# Altium PCB 汽车空调控制器-540V-ADP32F036QP48Q.pcbdoc (part 2 of 2)
Units mm, origin at the board's own origin, x right, y up, seen from the top; angles counter-clockwise.
Board outline 106.25 x 93.7 mm, 2 copper layers (Top Layer, Bottom Layer); 167 components, 106 nets, 476 pads, 259 vias.
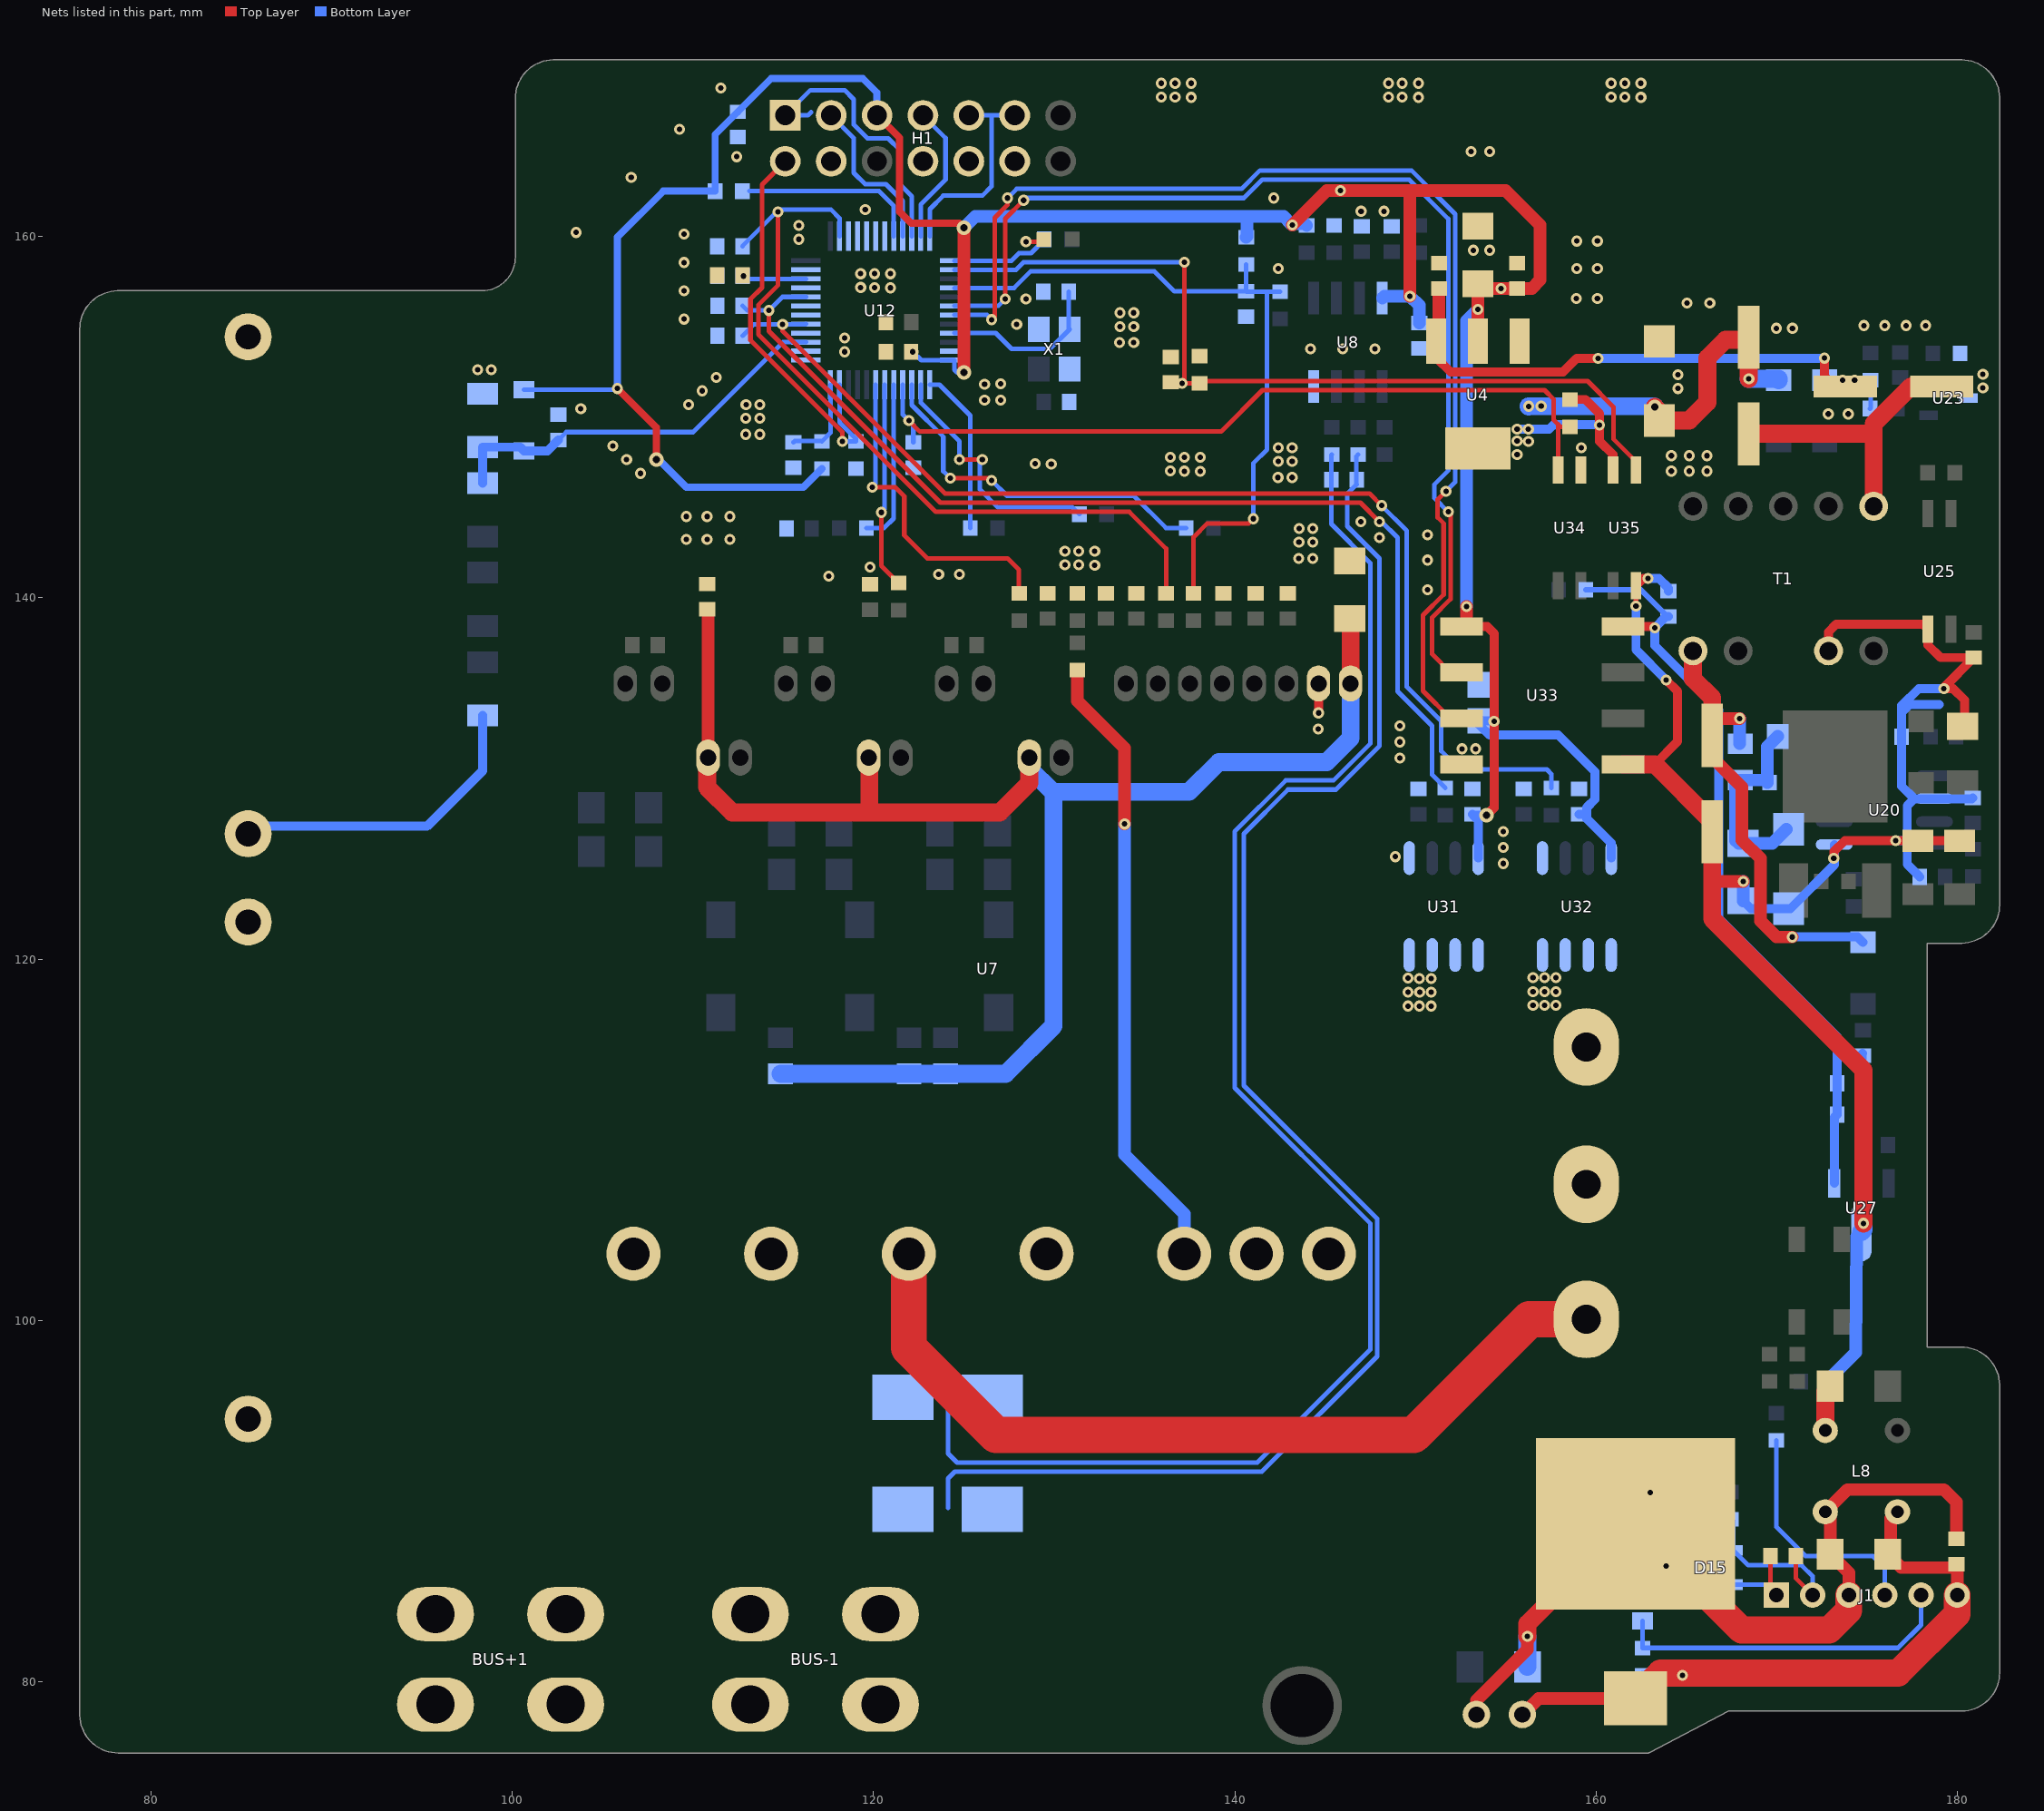
[diagram p2: the nets of this part, all layers, seen from the top]

## Via types
v1: diameter 0.61, hole 0.305, Top Layer to Bottom Layer, 254 vias
v2: diameter 0.8, hole 0.4, Top Layer to Bottom Layer, 5 vias

## Nets (pads, with @x,y where several pads share a name; then routed paths per layer and width w, separated by ;. In a path a pad name is that pad's centre, name@x,y a point inside that pad or via, vN(x,y) a via of type N, cw(c..) or ccw(c..) an arc to the next point about the centre after c; other vN are vias at no path point) (continued)
$4N1962: C71.1 U12.21 X1.1 | length 9.3
  Bottom Layer w0.254: U12.21@124.479,154.647 126.766,154.647 127.645,153.768 129.768,153.768 X1.1@130.853,154.853 130.809,154.896 C71.1@130.809,156.928
$4N10163: C65.2 C75.2 U12.46 | length 3.6
  Bottom Layer w0.254: C75.2@112.763,157.802 112.918,157.647 U12.46@116.259,157.647
  other v1: 112.816,157.802
$4N10279: R52.1 U12.13 | length 5.5
  Bottom Layer w0.254: U12.13@124.479,158.647 127.631,158.647 128.056,159.072 128.728,159.072 129.462,159.805 R52.1@129.462,159.834
$4N10403: R54.1 U12.8 | length 10
  Bottom Layer w0.254: R54.1@113.126,162.501 120.309,162.501 121.119,161.69 U12.8@121.119,160.007
+3.3V: C14.1 C48.1 C69.1 C73.1 C92.2 C111.1 C113.1 C140.2 D16.1 H1.5 R47.2 R54.2 R109.2 R115.2 R133.2 U4.2 U4.4 U8.8 U12.24 U31.8 U32.8 U33.1 U35.4 | length 184.4
  Top Layer w0.4: v1(105.831,151.579) 107.99,149.42 v2(107.99,147.642) ; H1.5@120.199,166.692 121.452,165.439 121.452,161.358 122.087,160.723 124.754,160.723 v2(125.008,160.469)
  Top Layer w0.5: U33.1@152.55,138.404 153.967,138.404 154.351,138.02 ; v2(153.926,127.957) 154.345,128.375 v1(154.345,133.164) 154.345,138.02 ; R115.2@158.545,150.965 158.554,150.974 159.395,150.974 160.187,150.182 v1(160.187,149.547) 160.187,148.658 160.929,147.916 U35.4@160.929,147.065
  Top Layer w0.7: v2(125.008,152.468) v2(125.008,160.469) ; v1(143.175,160.626) 145.08,162.531 v1(145.842,162.531) 149.696,162.531 ; v1(149.696,156.689) 149.696,162.531 ; U33.1@152.55,138.404 152.821,138.675 v1(152.821,139.514) ; U4.2@153.45,154.201 v1(153.45,155.955) C92.2@153.45,157.382 153.717,157.115 v1(154.74,157.115) C14.1@155.621,157.115 156.428,157.115 156.891,157.578 156.891,160.626 154.986,162.531 149.696,162.531
  Bottom Layer w0.254: D16.1@100.666,151.509 105.61,151.509 105.679,151.579 v1(105.831,151.579) ; v1(122.181,153.611) 122.646,153.147 U12.24@124.479,153.147 124.479,152.615 124.627,152.468 v2(125.008,152.468)
  Bottom Layer w0.4: v1(105.831,151.579) 105.831,159.961 108.371,162.501 R54.2@111.238,162.501 111.238,165.633 C73.1@112.493,166.888 114.329,168.724 119.42,168.724 120.199,167.944 H1.5@120.199,166.692 ; v2(107.99,147.642) 108.117,147.642 109.641,146.118 116.118,146.118 R47.2@117.143,147.142
  Bottom Layer w0.5: C111.1@153.145,128.019 C111.1@153.207,127.957 ; U31.8@153.465,125.593 153.465,127.699 C111.1@153.207,127.957 ; v2(153.926,127.957) C111.1@153.207,127.957 ; v1(154.345,133.164) 154.326,133.182 C140.2@153.553,133.182 153.553,132.94 154.091,132.402 157.901,132.402 159.933,130.37 159.933,128.846 159.487,128.4 C113.1@159.487,128.019 ; v1(155.621,149.323) v1(156.247,149.323) 157.399,149.323 157.653,149.577 160.157,149.577 v1(160.187,149.547) ; C113.1@159.044,128.019 C113.1@159.487,128.019 ; U32.8@160.831,125.593 160.831,126.424 159.487,127.768 C113.1@159.487,128.019
  Bottom Layer w0.7: v2(125.008,160.469) 125.643,161.104 140.666,161.104 ; R133.2@140.632,159.952 140.666,159.986 140.666,161.104 ; v1(143.175,160.626) v1@143.093,160.708 ; R109.2@143.973,160.603 143.868,160.708 v1@143.093,160.708 ; U8.8@148.165,156.585 148.269,156.689 v1(149.696,156.689) 150.212,156.173 C48.1@150.212,155.2 ; v1(152.821,139.514) 152.821,155.326 v1(153.45,155.955) ; 140.666,161.104 142.697,161.104 v1@143.093,160.708
  other v1: 155.621,147.926 155.621,148.672 156.25,148.658
+6.3V: C13.1 C105.1 D28.2 R76.2 R85.2 U4.3 | length 32.5
  Top Layer w0.5: U4.3@151.15,154.201 151.15,153.286 151.938,152.498 158.161,152.498 158.915,153.252 v1(160.108,153.252) ; v1(172.639,153.26) 172.639,152.244 173.196,151.687 C105.1@173.782,151.687
  Top Layer w0.7: U4.3@151.15,154.201 151.303,154.354 C13.1@151.303,157.115
  Bottom Layer w0.254: R76.2@175.153,150.469 175.182,150.498 R85.2@175.182,152.039
  Bottom Layer w0.5: v1(160.108,153.252) 172.631,153.252 v1(172.639,153.26) ; D28.2@172.642,152.042 172.645,152.039 v1(173.633,152.039) v1(174.3,152.039) R85.2@175.182,152.039
+12V: C101.1 D26.2 R121.2 T1.1 | length 25.6
  Top Layer w0.7: C101.1@166.419,132.383 166.419,131.159 168.067,129.511 168.067,126.59 169.083,125.574 169.083,122.109 169.966,121.226 v1(170.855,121.226) ; C101.1@166.419,133.321 v1(167.94,133.321)
  Top Layer w1: T1.1@165.356,137.06 165.356,135.524 166.419,134.461 166.419,133.321 C101.1@166.419,132.383
  Bottom Layer w0.5: v1(170.855,121.226) 174.461,121.226 D26.2@174.76,120.927
  Bottom Layer w0.7: R121.2@167.94,131.924 v1(167.94,133.321)
+12VB: 24V.1 C95.1 C139.2 D19.2 J1.6 L8.4 R117.1 | length 38.2
  Top Layer w0.7: 24V.1@155.91,78.203 156.803,79.096 D19.2@162.172,79.096 ; C139.2@176.14,87.07 C139.2@176.304,86.906 ; L8.4@176.674,89.418 176.304,89.048 C139.2@176.304,86.906 ; J1.6@179.975,84.81 179.975,86.481 C95.1@179.933,86.523 179.741,86.331 176.879,86.331 C139.2@176.304,86.906
  Top Layer w1.5: D19.2@162.172,79.096 163.565,80.489 176.703,80.489 179.975,83.761 J1.6@179.975,84.81
  Bottom Layer w0.5: R117.1@162.561,80.374 162.563,80.376 v1(164.765,80.376)
+15V: C106.1 C118.2 C119.1 D25.1 D27.2 R130.1 R131.1 R132.1 U7.1 U7.10 U7.14 U7.18 | length 109.6
  Top Layer w0.7: C119.1@110.793,139.355 110.847,139.301 U7.18@110.847,131.16
  Top Layer w1: U7.18@110.847,131.16 110.79,131.102 110.79,129.511 112.187,128.114 119.775,128.114 ; U7.14@119.737,131.16 119.775,131.122 119.775,128.114 ; U7.10@128.627,131.16 128.627,129.746 126.995,128.114 119.775,128.114 ; C118.2@146.353,138.843 146.407,138.789 U7.1@146.407,135.26 ; v2(163.235,150.563) 163.498,150.3 D25.1@163.498,149.801 165.14,149.801 166.156,150.817 166.156,153.276 167.156,154.276 168.297,154.276 C106.1@168.43,154.409 168.43,152.135 v1(168.448,152.117)
  Bottom Layer w1: R132.1@114.861,113.655 R131.1@121.969,113.655 R130.1@124.001,113.655 127.319,113.655 129.967,116.303 129.967,129.216 129.926,129.257 ; U7.10@128.627,131.16 128.627,130.556 129.926,129.257 ; U7.1@146.407,135.26 146.407,132.235 145.08,130.908 139.111,130.908 137.46,129.257 129.926,129.257 ; v1(156.254,150.593) 156.259,150.598 v1(156.954,150.598) 163.199,150.598 v2(163.235,150.563) ; v1(168.448,152.117) 170.102,152.117 D27.2@170.102,152.042
BUS+: BUS+1.1 BUS+1.2 BUS+1.3 BUS+1.4 C1.2 C2.2 R48.2 U7.27 | length 17.5
  Bottom Layer w0.5: C2.2@85.393,126.94 85.805,127.352 95.296,127.352 98.38,130.436 R48.2@98.38,133.479
CANH: C57.2 D15.1 J1.2 R113.2 | length 10.3
  Top Layer w0.254: C57.2@171.039,86.969 171.039,85.746 J1.2@171.975,84.81
  Bottom Layer w0.254: R113.2@167.461,89.007 167.582,88.886 D15.1@167.582,87.284 168.408,86.458 171.369,86.458 171.975,85.852 J1.2@171.975,84.81
CANL: C57.1 D15.2 J1.1 R114.2 | length 9.2
  Top Layer w0.254: C57.1@169.639,86.969 169.639,85.146 J1.1@169.975,84.81
  Bottom Layer w0.254: R114.2@165.908,89.01 165.908,87.058 D15.2@167.582,85.384 169.401,85.384 J1.1@169.975,84.81
GATE_KILL: C110.2 R93.1 R110.1 R133.1 U12.16 | length 40.1
  Top Layer w0.254: R110.1@137.717,140.245 137.717,143.357 138.476,144.116 140.762,144.116 v1(141.016,144.37)
  Bottom Layer w0.254: U12.16@124.479,157.147 127.782,157.147 128.691,158.056 135.549,158.056 136.652,156.952 C110.2@140.629,156.952 ; R133.1@140.632,158.445 140.632,156.955 C110.2@140.629,156.952 ; v1(141.016,144.37) 141.016,147.434 141.772,148.19 141.772,156.934 ; R93.1@142.499,156.934 141.772,156.934 ; C110.2@140.629,156.952 140.647,156.934 141.772,156.934
GND: BUS-1.1 BUS-1.2 BUS-1.3 BUS-1.4 C1.1 C2.1 C13.2 C14.2 C32.1 C33.1 C34.1 C35.1 C36.1 C37.1 C42.2 C48.2 C59.1 C60.1 C61.2 C65.1 C69.2 C70.2 C71.2 C73.2 C75.1 C92.1 C105.2 C106.2 C107.1 C108.1 C109.1 C110.1 C111.2 C112.1 C113.2 C114.1 C118.1 C119.2 C120.2 C121.1 C122.1 C123.1 C125.1 C127.1 C140.1 D25.2 H1.4 H1.8 H1.10 H1.12 LED1.1 R19.1 R32.1 R86.1 R89.2 R90.2 R99.1 R108.2 R118.1 R129.1 T1.6 U4.1 U7.2 U8.4 U12.3 U12.4 U12.5 U12.6 U12.7 U12.23 U12.37 U12.38 U12.40 U12.42 U12.43 U12.45 U12.47 U23.3 U31.5 U32.5 U33.4 U34.3 X1.2 X1.4 | length 105.6
  Top Layer w0.254: v1(128.437,159.707) 129.292,159.707 LED1.1@129.415,159.83
  Top Layer w0.5: v1(144.629,133.624) U7.2@144.629,135.26
  Top Layer w1: C106.2@168.43,149.069 168.448,149.087 175.356,149.087 ; T1.6@175.356,145.06 175.356,149.087 ; C105.2@179.122,151.687 177.416,151.687 175.356,149.627 175.356,149.087
  Bottom Layer w0.254: 124.125,89.633 124.125,91.259 124.5,91.635 141.493,91.635 147.874,98.015 147.874,105.635 140.502,113.007 140.502,126.941 142.945,129.384 145.588,129.384 148.001,131.797 148.001,142.175 146.217,143.959 146.217,145.755 C120.2@146.731,146.269 ; C120.2@146.737,146.275 C120.2@146.731,146.269 ; R108.2@146.817,147.92 146.731,147.833 C120.2@146.731,146.269
  other v1: 154.853,125.29 148.884,125.671 154.853,126.179 154.853,127.068 149.138,131.132 152.567,131.64 153.329,131.64 149.138,132.021 144.614,132.735 149.138,132.91 150.668,140.433 117.521,141.195 123.611,141.292 124.754,141.292 119.816,141.699 131.359,141.818 132.248,141.803 130.597,141.827 150.668,142.084 143.532,142.181 144.312,142.181 130.597,142.584 131.359,142.584 132.248,142.584 143.547,143.07 144.312,143.07 109.647,143.227 110.79,143.227 112.06,143.227 147.995,143.324 150.668,143.481 143.555,143.832 144.312,143.832 146.979,144.213 109.647,144.497 110.79,144.497 112.06,144.497 142.389,146.656 143.17,146.656 107.101,146.88 138.089,146.988 136.438,147.012 137.2,147.003 164.156,147.007 165.145,147.007 166.133,147.007 129.84,147.403 128.951,147.418 142.404,147.545 143.17,147.545 106.339,147.642 136.438,147.769 137.2,147.769 138.089,147.769 164.156,147.86 165.145,147.86 166.133,147.86 142.413,148.307 143.17,148.307 159.177,148.307 105.577,148.404 112.925,149.039 113.705,149.039 112.94,149.928 113.705,149.928 172.845,150.169 173.948,150.169 103.805,150.463 109.768,150.69 112.948,150.69 113.705,150.69 126.151,150.944 127.04,150.944 110.53,151.452 164.526,151.579 181.402,151.609 126.151,151.81 127.04,151.833 111.292,152.19 164.526,152.341 181.402,152.371 98.09,152.625 98.852,152.625 118.404,153.611 144.191,153.768 145.969,153.768 147.747,153.768 133.626,154.119 134.406,154.119 118.404,154.368 169.972,154.911 170.861,154.911 133.641,155.008 134.406,155.008 174.818,155.062 175.968,155.062 177.15,155.062 178.231,155.062 127.929,155.135 109.52,155.419 133.649,155.77 134.406,155.77 165.019,156.308 166.289,156.308 128.437,156.532 158.904,156.562 160.066,156.562 109.52,156.985 120.944,157.148 119.293,157.172 120.055,157.163 119.293,157.929 120.055,157.929 120.944,157.929 142.413,158.213 158.919,158.213 160.066,158.213 109.52,158.552 153.208,159.229 154.097,159.229 158.928,159.737 160.066,159.737 115.864,159.834 109.52,160.118 103.545,160.215 115.864,160.596 146.985,161.388 148.255,161.388 119.547,161.485 142.153,162.12 106.593,163.263 112.435,164.406 153.081,164.69 154.097,164.69 109.26,165.93 137.581,167.689 150.154,167.689 162.473,167.689 135.93,167.713 136.692,167.704 148.503,167.713 149.265,167.704 160.822,167.713 161.584,167.704 111.546,168.216 135.93,168.47 136.692,168.47 137.581,168.47 148.503,168.47 149.265,168.47 150.154,168.47 160.822,168.47 161.584,168.47 162.473,168.47
GND_12V: C22.1 C89.1 C90.2 C98.2 C101.2 C102.1 C103.2 C104.2 C116.1 C117.2 C124.2 C128.1 C129.1 C138.1 D29.2 L8.2 R1.1 R122.1 T1.4 U20.2 U20.5 U25.3 U27.2 U33.5 U35.2 | length 123.2
  Top Layer w0.254: v1(162.199,139.544) U35.2@162.199,140.665
  Top Layer w0.5: U35.2@162.199,140.665 162.602,141.068 v1(162.86,141.068) ; 163.238,130.784 164.505,132.051 164.505,134.815 v1(163.87,135.45) ; T1.4@172.856,137.06 172.856,138.11 173.274,138.528 178.081,138.528 U25.3@178.357,138.252 178.357,137.382 179.051,136.688 C117.2@180.897,136.688 179.243,135.034 v1(179.243,134.972) 179.751,134.972 180.386,134.337 180.386,132.999 C102.1@180.272,132.885 ; v1(173.147,125.574) 173.147,125.955 173.752,126.561 v1(176.576,126.561) 176.576,126.59 176.618,126.548 R1.1@177.796,126.548 R122.1@180.106,126.548
  Top Layer w0.7: 166.419,124.328 166.443,124.304 v1(168.129,124.304)
  Top Layer w1: U33.5@161.492,130.784 163.238,130.784 166.419,127.603 C101.2@166.419,127.043 166.419,124.328 166.419,122.233 174.798,113.854 v1(174.798,105.381) ; L8.2@172.674,93.918 172.674,96.081 C138.1@172.954,96.361
  Bottom Layer w0.5: v1(162.199,139.544) 162.199,137.121 v1(163.87,135.45) ; v1(162.86,141.068) 163.461,141.068 164.003,140.527 C124.2@164.003,140.356 ; C129.1@168.129,123.222 168.558,122.794 D29.2@170.65,122.794 170.747,122.794 173.172,125.218 v1@173.172,125.599 ; v1(173.147,125.574) v1@173.172,125.599 ; U20.5@173.172,126.339 v1@173.172,125.599 ; U27.2@174.724,104.939 C22.1@174.724,113.131 174.724,114.767 C98.2@174.739,114.782 ; v1(176.576,126.561) 177.211,126.561 ; C89.1@177.903,124.561 177.211,125.253 177.211,126.561 ; 178.989,134.083 177.338,134.083 176.906,133.651 ; v1(179.243,134.972) 177.846,134.972 176.906,134.032 176.906,133.651 ; C116.1@180.835,128.929 180.786,128.879 U20.2@178.716,128.879 177.595,128.879 ; 176.906,133.651 C90.2@176.906,132.313 176.906,129.568 177.595,128.879 ; 177.211,126.561 177.211,128.495 177.595,128.879
  Bottom Layer w0.7: C129.1@168.129,123.222 v1(168.129,124.304) ; L8.2@172.674,93.918 172.674,96.57 C128.1@172.725,96.621 ; C128.1@172.763,96.584 C128.1@172.725,96.621 ; U27.2@174.674,104.889 174.417,104.632 174.354,98.249 C128.1@172.725,96.621
  Bottom Layer w1: U27.2@174.674,104.889 174.724,104.939 174.798,105.013 v1(174.798,105.381)
IS: C120.1 R89.1 R90.1 R107.2 R112.2 U7.21 U7.22 U7.23 | length 121.9
  Top Layer w0.7: R112.2@131.282,136 131.282,134.292 133.904,131.67 v1(133.904,127.479)
  Bottom Layer w0.254: 124.125,95.475 124.125,92.645 124.627,92.143 141.239,92.143 147.493,98.396 147.493,105.381 139.994,112.88 139.994,127.068 142.818,129.892 145.461,129.892 147.493,131.924 147.493,141.921 145.337,144.077 C120.1@145.337,146.529 145.337,147.887 R107.2@145.37,147.92
  Bottom Layer w0.7: v1(133.904,127.479) 133.904,109.191 137.2,105.895 U7.23@137.2,103.7
PWM_I: C127.2 R118.2 U12.14 U35.3 | length 48.9
  Top Layer w0.254: C127.2@136.462,151.928 136.515,151.875 v1@137.09,151.875 ; v1(137.079,151.863) 137.126,151.863 v1@137.137,151.875 ; v1(137.2,158.564) 137.2,151.984 v1@137.09,151.875 ; U35.3@162.199,147.065 162.199,147.535 160.949,148.785 160.949,150.563 159.522,151.99 138.164,151.99 R118.2@138.048,151.875 v1@137.137,151.875 ; v1@137.09,151.875 v1@137.137,151.875
  Bottom Layer w0.254: U12.14@124.479,158.147 127.893,158.147 128.31,158.564 v1(137.2,158.564)
PWMI: J1.4 R119.2 | length 13.2
  Bottom Layer w0.254: R119.2@169.975,93.371 169.975,88.578 171.587,86.966 175.306,86.966 175.975,86.297 J1.4@175.975,84.81
RXD: U12.18 U33.2 | length 61
  Top Layer w0.254: v1(127.294,156.532) 127.294,160.977 v1(128.31,161.993) ; v1(151.811,144.751) 151.938,144.624 151.938,139.925 150.922,138.909 150.922,136.877 151.935,135.864 U33.2@152.55,135.864
  Bottom Layer w0.254: U12.18@124.479,156.147 126.909,156.147 v1(127.294,156.532) ; v1(128.31,161.993) 128.437,162.12 140.502,162.12 141.518,163.136 149.646,163.136 151.811,160.971 151.811,147.037 151.049,146.275 151.049,145.513 v1(151.811,144.751)
STB: D35.1 J1.5 R117.2 | length 19.1
  Bottom Layer w0.254: R117.2@162.561,81.88 R117.2@162.566,81.886 ; D35.1@162.571,83.372 162.566,83.367 R117.2@162.566,81.886 ; J1.5@177.975,84.81 177.975,83.158 176.703,81.886 R117.2@162.566,81.886
STB0: C125.2 R115.1 U12.28 U34.4 | length 45.2
  Top Layer w0.254: v1(121.96,149.801) 122.565,149.196 139.238,149.196 141.524,151.482 157.145,151.482 157.653,150.974 157.653,149.831 157.888,149.596 ; U34.4@157.888,147.065 157.888,149.596 ; R115.1@158.545,149.459 158.025,149.459 157.888,149.596
  Bottom Layer w0.254: U12.28@121.619,151.787 121.619,150.141 v1(121.96,149.801) 122.209,149.552 C125.2@122.209,148.604
TCK: H1.9 H1.11 U12.12 | length 11.9
  Bottom Layer w0.254: U12.12@123.119,160.007 123.119,161.501 123.865,162.247 126.024,162.247 126.532,162.755 126.532,166.674 126.515,166.692 ; H1.9@125.279,166.692 126.515,166.692 ; H1.11@127.819,166.692 126.515,166.692
TDI: H1.3 U12.9 | length 9
  Bottom Layer w0.254: H1.3@117.659,166.692 118.912,165.439 118.912,163.517 119.547,162.882 120.69,162.882 121.619,161.952 U12.9@121.619,160.007
TDO: H1.7 U12.11 | length 7.8
  Bottom Layer w0.254: U12.11@122.619,160.007 122.619,161.763 123.992,163.136 123.992,165.439 H1.7@122.739,166.692
TMP: C42.1 R111.1 U12.2 | length 44.4
  Top Layer w0.254: v1(114.721,161.358) 114.721,157.294 113.629,156.201 113.629,154.576 123.454,144.751 134.158,144.751 136.193,142.716 R111.1@136.193,140.435
  Bottom Layer w0.254: C42.1@112.747,159.453 114.779,161.485 117.642,161.485 118.119,161.007 U12.2@118.119,160.007
TMS: H1.1 U12.10 | length 15.6
  Bottom Layer w0.254: 116.543,166.863 116.372,166.692 H1.1@115.119,166.692 116.516,168.089 118.404,168.089 118.912,167.581 118.912,166.184 119.674,165.422 120.817,165.422 121.452,164.787 121.452,162.882 122.119,162.214 U12.10@122.119,160.007
TRST: H1.2 R99.2 U12.35 | length 22.7
  Top Layer w0.254: H1.2@115.119,164.152 113.832,162.864 113.832,157.167 113.197,156.532 113.197,154.246 118.277,149.166 v1(118.277,148.658) 118.395,148.658 v1@118.404,148.649
  Bottom Layer w0.254: U12.35@118.119,151.787 118.119,149.704 119.028,148.796 R99.2@119.028,148.649 v1@118.404,148.649
TXD: U12.19 U33.3 | length 65.8
  Top Layer w0.254: v1(126.532,155.389) 126.71,155.566 126.71,161.027 127.421,161.739 v1(127.421,162.12) ; v1(151.684,145.894) 151.226,145.437 151.226,144.446 151.557,144.116 151.557,140.179 150.414,139.036 150.414,134.845 151.935,133.324 U33.3@152.55,133.324
  Bottom Layer w0.254: U12.19@124.479,155.647 126.274,155.647 v1(126.532,155.389) ; v1(127.421,162.12) 127.929,162.628 140.375,162.628 141.391,163.644 149.773,163.644 152.192,161.225 152.192,146.402 v1(151.684,145.894)
U: U7.26 U31.3 U31.4
  other v1: 149.578,117.407 150.219,117.407 150.857,117.407 149.578,118.169 150.227,118.169 150.857,118.169 150.214,118.931 150.857,118.931 149.578,118.949
U+: U31.1 U31.2 W1.1
U_H: R123.1 U12.29 | length 9.1
  Bottom Layer w0.254: R123.1@119.6,143.862 120.593,143.862 121.119,144.388 U12.29@121.119,151.787
U_I: C112.2 R95.1 U12.44 | length 59.5
  Top Layer w0.254: v1(114.213,155.897) 114.213,154.754 123.708,145.259 146.949,145.259 v1(147.995,144.213)
  Bottom Layer w0.254: C112.2@112.763,156.151 113.017,155.897 v1(114.213,155.897) 114.963,156.647 U12.44@116.259,156.647 ; v1(147.995,144.213) 148.122,144.213 149.011,143.324 149.011,134.815 150.916,132.91 150.916,130.205 R95.1@151.649,129.472
U_L: R126.1 U12.25 | length 9.2
  Bottom Layer w0.254: U12.25@123.119,151.787 123.657,151.787 125.362,150.082 R126.1@125.362,143.862
V: U7.25 V1.1 | length 47.3
  Top Layer w2: U7.25@121.96,103.696 121.96,98.493 126.786,93.667 149.9,93.667 156.3,100.067 V1.1@159.446,100.067
V5G: C22.2 C104.1 C124.1 R116.2 U27.1 U33.8 | length 42.9
  Top Layer w0.5: U33.8@161.492,138.404 163.176,138.404 v1(163.241,138.339)
  Bottom Layer w0.3: R116.2@159.425,140.436 162.476,140.436 C124.1@163.956,138.956
  Bottom Layer w0.5: C124.1@164.003,138.956 163.956,138.956 163.857,138.956 v1(163.241,138.339) 163.241,137.349 166.791,133.799 166.791,122.242 173.323,115.709 C22.2@173.323,113.131 C104.1@173.323,111.389 ; U27.1@173.174,107.602 173.174,111.24 C104.1@173.323,111.389 ; C104.1@173.339,111.404 C104.1@173.323,111.389
V10A: C129.2 D29.1 D30.2 R81.2 R121.1 | length 11.1
  Bottom Layer w0.7: D30.2@170.053,132.323 169.476,131.745 169.476,129.768 169.333,129.911 167.719,129.911 167.719,126.564 167.875,126.408 169.752,126.408 D29.1@170.523,127.178
V_BUS: C61.1 D16.2 R50.1 R129.2 U12.39 | length 22.5
  Bottom Layer w0.254: C61.1@102.571,148.735 103.001,149.166 110.022,149.166 115.003,154.147 U12.39@116.259,154.147
  Bottom Layer w0.5: R50.1@98.38,146.342 R129.2@98.38,148.338 100.452,148.338 D16.2@100.666,148.124 101.96,148.124 C61.1@102.571,148.735
V_H: R124.1 U12.30 | length 11.4
  Top Layer w0.254: v1(120.436,144.721) 120.436,141.762 R124.1@121.389,140.808
  Bottom Layer w0.254: v1(120.436,144.721) 120.619,144.904 U12.30@120.619,151.787
V_L: R127.1 U12.26 | length 14.1
  Top Layer w0.254: v1(124.754,147.642) v1(126.024,147.642)
  Bottom Layer w0.254: U12.26@122.619,151.787 122.619,150.792 124.754,148.658 v1(124.754,147.642) ; v1(126.024,147.642) 125.897,147.515 125.897,145.991 126.883,145.005 131.015,145.005 R127.1@131.396,144.624
VB12-: 24V.2 C95.2 C115.1 C126.1 C139.1 D15.3 D19.1 J1.3 L8.1 | length 49
  Top Layer w0.7: 24V.2@153.37,78.203 153.37,78.976 156.197,81.803 v1(156.197,82.521) ; J1.3@173.975,84.81 173.975,86.05 C139.1@172.954,87.07 172.954,89.138 L8.1@172.674,89.418 173.905,90.649 179.243,90.649 179.933,89.959 C95.2@179.933,87.923
  Top Layer w1: v1(156.197,82.521) 156.197,83.225 D19.1@161.719,88.746
  Top Layer w1.5: D19.1@162.172,88.746 168.047,82.872 172.887,82.872 173.975,83.96 J1.3@173.975,84.81
  Bottom Layer w0.5: v1(162.981,90.492) 164.216,90.492 C126.1@164.248,90.46 ; v1(163.87,86.428) 163.964,86.334 D15.3@165.112,86.334
  Bottom Layer w1: C115.1@156.197,80.835 v1(156.197,82.521)
W: U7.24 U32.3 U32.4
  other v1: 156.501,117.446 157.145,117.446 157.774,117.446 156.501,118.208 157.145,118.208 157.774,118.208 156.501,118.97 157.145,118.97 157.774,118.97
W+: U1.1 U32.1 U32.2
W_H: R125.1 U12.31 | length 18.3
  Top Layer w0.254: v1(119.928,146.118) 121.198,146.118 121.706,145.61 121.706,143.451 122.976,142.181 127.421,142.181 128.056,141.546 128.056,140.254 R125.1@128.065,140.245
  Bottom Layer w0.254: v1(119.928,146.118) 120.119,146.309 U12.31@120.119,151.787
W_I: C114.2 R96.1 U12.41 | length 63.6
  Top Layer w0.254: v1(114.975,155.135) 114.975,154.754 123.962,145.767 147.457,145.767 v1(148.122,145.102)
  Bottom Layer w0.254: C114.2@112.763,154.5 113.398,155.135 v1(114.975,155.135) 116.247,155.135 U12.41@116.259,155.147 ; v1(148.122,145.102) 149.519,143.705 149.519,135.069 151.424,133.164 151.424,131.513 152.44,130.497 157.266,130.497 157.52,130.243 R96.1@157.52,129.464
W_L: R128.1 U12.27 | length 20.3
  Top Layer w0.254: v1(124.246,146.626) 126.405,146.626 v1(126.532,146.499)
  Bottom Layer w0.254: U12.27@122.119,151.787 122.119,150.657 123.865,148.912 123.865,147.007 v1(124.246,146.626) ; v1(126.532,146.499) 127.391,145.64 134.412,145.64 136.19,143.862 R128.1@137.318,143.862
XRS: C60.2 R47.1 U12.36 | length 5
  Bottom Layer w0.254: C60.2@115.564,148.596 115.633,148.665 R47.1@117.159,148.665 ; R47.1@117.143,148.649 R47.1@117.159,148.665 ; U12.36@117.619,151.787 117.619,149.125 R47.1@117.159,148.665
pads on no net: H1.6 H1.13 H1.14 T1.9 T1.10 U12.1 U12.15 U12.17 U12.32 U12.33 U12.34 U12.48

## Polygon pours and split planes (outlines as drawn)
GND on Bottom Layer "Bottom Layer-GND" (solid, remove dead copper, pour order 40): 96.947,154.53 96.947,150.305 97.465,149.786 102.96,149.786 107.869,144.878 107.869,141.576 108.758,140.687 126.635,140.687 127.404,139.918 143.436,139.918 143.937,139.417 143.937,131.756 154.661,131.756 154.661,143.664 157.399,146.402 180.386,146.402 181.91,147.926 181.91,157.705 170.226,169.389 111.806,169.389
GND on Bottom Layer "Bottom Layer-GND 1" (solid, remove dead copper, pour order 38): 148.249,125.29 148.884,124.655 160.949,124.655 161.203,124.909 161.203,129.735 157.755,133.182 149.157,133.182 148.249,132.275
W+ on Bottom Layer "Bottom Layer-W+" (solid, remove dead copper, pour order 36): 161.203,121.226 161.33,121.099 161.33,113.352 160.949,112.971 157.774,112.971 157.266,113.479 157.266,116.019 159.171,117.924 159.171,121.099 159.298,121.226
U+ on Bottom Layer "Bottom Layer-U+" (solid, remove dead copper, pour order 34): 151.932,121.226 153.71,121.226 153.837,121.099 153.837,112.717 156.631,109.923 161.076,109.923 161.838,109.161 161.838,105.732 161.33,105.224 155.361,105.224 151.678,108.907 151.678,120.972
W on Bottom Layer "Bottom Layer-W" (solid, remove dead copper, pour order 32): 157.021,121.221 158.541,121.221 158.663,121.099 158.663,117.914 157.774,117.025 156.387,117.025 156.123,117.289 156.123,119.049 156.628,119.554 156.628,121.096 156.758,121.226 157.016,121.226
U on Bottom Layer "Bottom Layer-U" (solid, remove dead copper, pour order 30): 151.297,121.099 151.297,117.035 151.17,116.908 149.392,116.908 149.265,117.035 149.265,121.099 149.392,121.226 151.17,121.226
IS on Bottom Layer "Bottom Layer-IS" (solid, remove dead copper, pour order 28): 135.555,107.032 133.523,109.064 134.412,109.064 138.73,104.746 138.73,102.587 138.349,102.206 135.936,102.206 135.555,102.587
GND on Bottom Layer "Bottom Layer-GND 2" (solid, remove dead copper, pour order 26): 143.937,134.21 143.429,133.702 133.396,133.702 132.507,134.591 132.507,136.481 133.34,137.314 138.125,137.314 138.968,138.157 138.968,140.649 138.755,140.862 126.84,140.862 126.665,140.687 129.639,137.713 129.639,130.601 130.094,130.146 137.079,130.146 138.603,131.67 144.699,131.67 145.588,132.559 145.588,135.861 144.953,136.496 143.937,135.48
+3.3V on Bottom Layer "Bottom Layer-+3.3V" (solid, remove dead copper, pour order 24): 156.072,157.52 153.728,157.52 153.451,157.242 153.451,147.429 153.589,147.291 155.748,147.291 156.637,148.18 156.637,149.577 156.129,150.085 156.129,157.462
BUS+ on Bottom Layer "Bottom Layer-BUS+" (solid, remove dead copper, pour order 22): 108.631,102.968 108.631,107.667 106.472,109.826 94.153,109.826 89.581,114.398 89.581,128.241 88.819,129.003 84.628,129.003 83.993,128.368 83.993,108.937 91.105,101.825 107.488,101.825
IS on Bottom Layer "Bottom Layer-IS 1" (solid, remove dead copper, pour order 20): 136.698,106.27 145.588,106.27 146.731,105.127 146.731,98.396 142.667,94.332 119.934,94.332 119.807,94.459 119.807,97.634 120.315,98.142 134.158,98.142 135.555,99.539 135.555,105.127
GND on Bottom Layer "Bottom Layer-GND 3" (solid, remove dead copper, pour order 18): 124.633,77.695 124.633,83.537 129.078,87.982 129.078,90.776 128.57,91.284 118.664,91.284 117.14,92.808 117.14,95.856 116.124,96.872 89.835,96.872 80.691,106.016 80.691,138.655 88.057,146.021 88.057,155.292 87.422,155.927 77.516,155.927 76.627,155.038 76.627,95.221 81.834,90.014 109.393,90.014 110.663,88.744 110.663,77.695 111.425,76.933 123.871,76.933
GND on Top Layer "Top Layer-GND" (solid, remove dead copper, pour order 16): 77.516,155.8 76.754,155.038 76.754,95.221 81.58,90.395 86.152,90.395 87.168,91.411 87.168,99.158 80.621,105.705 80.621,148.491 84.374,152.244 101.265,152.244 107.742,145.767 107.742,141.576 108.758,140.56 126.762,140.56 127.404,139.918 143.309,139.918 143.81,139.417 143.81,131.046 147.943,126.913 153.546,126.913 154.131,127.498 154.131,145.293 155.113,146.275 180.259,146.275 181.91,147.926 181.91,157.578 170.099,169.389 111.806,169.389 98.217,155.8
GND on Top Layer "Top Layer-GND 1" (solid, remove dead copper, pour order 14): 146.74,128.069 148.376,126.433 148.376,125.163 148.884,124.655 157.313,124.655 157.626,124.968 157.626,127.057 157.052,127.631 153.583,127.631 153.145,128.069
W on Top Layer "Top Layer-W" (solid, remove dead copper, pour order 12): 158.251,119.575 158.663,119.163 158.663,117.897 156.377,115.611 156.377,112.082 154.599,110.304 154.599,104.208 147.487,97.096 132.247,97.096 128.056,101.287 128.056,104.843 128.437,105.224 130.723,105.224 131.104,104.843 131.104,101.922 133.898,99.128 146.598,99.128 152.186,104.716 152.186,111.701 154.345,113.86 154.345,117.271 156.649,119.575
U on Top Layer "Top Layer-U" (solid, remove dead copper, pour order 10): 151.043,119.448 151.297,119.194 151.297,115.257 144.439,108.399 120.563,108.399 116.118,103.954 116.118,102.811 115.483,102.176 112.816,102.176 112.689,102.303 112.689,104.716 118.912,110.939 143.677,110.939 149.138,116.4 149.138,119.194 149.392,119.448
+3.3V on Top Layer "Top Layer-+3.3V" (solid, remove dead copper, pour order 8): 156.631,149.45 156.906,149.175 156.906,145.909 154.859,143.862 154.859,140.07 152.423,140.07 152.423,149.45
+3.3V on Top Layer "Top Layer-+3.3V 1" (solid, remove dead copper, pour order 6): 151.84,149.831 150.668,148.659 150.668,146.914 151.179,146.402 156.383,146.402 156.891,146.91 156.891,149.19 156.25,149.831
$1N16797 on Top Layer "Top Layer-$1N16797" (solid, remove dead copper, pour order 4): 166.67,137.512 166.67,135.861 169.124,133.407 169.124,127.85 169.745,127.229 176.096,127.229 176.708,127.841 176.708,134.078 175.306,135.48 172.258,135.48 169.337,138.401 167.559,138.401
+15V on Top Layer "Top Layer-+15V" (solid, remove dead copper, pour order 2): 145.649,139.536 146.381,139.536 148.805,141.96 148.805,148.858 151.049,151.101 157.145,151.101 157.272,150.974 157.272,150.212 157.145,150.085 151.557,150.085 149.906,148.434 149.906,140.941 146.985,138.02 145.588,138.02 145.461,138.147 145.461,139.417 145.588,139.544 145.641,139.544
BUS+ on Top Layer "Top Layer-BUS+" (solid, remove dead copper, pour order 0): 104.694,76.933 105.456,77.695 105.456,86.204 98.725,92.935 98.725,105.127 89.581,114.271 89.581,128.241 88.819,129.003 84.755,129.003 83.993,128.241 83.993,109.001 91.131,101.863 91.131,78.304 92.502,76.933

## Keep-outs
Top Layer:
  region: 151.176,146.148 150.033,146.148 150.033,148.307 150.287,148.561 150.585,148.561 150.585,146.739
Bottom Layer:
  region: 148.27,131.64 145.73,129.1 143.677,129.1 143.677,129.636 145.484,129.636 147.741,131.894 147.741,132.021 148.27,132.021
  region: 147.874,149.009 145.842,149.009 145.842,144.159 147.747,142.254 147.747,131.797 148.27,131.797 148.27,142.323 146.731,143.862 146.731,145.386 147.874,146.529
Board Outline Layer:
  circle w0.254: c79.288,79.316 r1.75
  circle w0.254: c179.159,166.643 r1.75
  circle w0.254: c102.91,166.643 r1.75
  lines w0.254: 78.166,156.86 ccw(c78.2,154.86) 76.2,154.86 76.2,78.166 ccw(c78.2,78.2) 78.2,76.2 133.084,76.2 ; 78.2,156.86 98.31,156.86 ; 98.344,156.86 ccw(c98.31,158.86) 100.31,158.86 100.312,167.617 ; 100.31,167.643 cw(c102.31,167.643) 102.276,169.643 ; 102.31,169.643 180.22,169.643 ; 131.72,76.2 162.89,76.2 167.31,78.52 180.2,78.52 ; 180.2,121.01 178.2,121.01 178.2,98.41 180.2,98.41 cw(c180.2,96.41) 182.2,96.444 ; 180.2,169.643 cw(c180.2,167.643) 182.2,167.677 ; 180.234,78.52 ccw(c180.2,80.52) 182.2,80.52 182.2,96.41 ; 180.234,121.01 ccw(c180.2,123.01) 182.2,123.01 182.2,167.643
  lines w1.2: 155.875,138.096 155.875,141.068 ; 163.256,143.865 165.164,141.957 166.924,141.957
  lines w1.3: 154.345,93.667 156.377,95.699 161.076,95.699 162.865,97.488 ; 162.865,119.34 162.865,126.34

## Other copper
Top Layer:
  pour cut-out: 174.798,145.894 174.798,146.91 174.29,147.418 169.337,147.418 168.702,146.783 168.702,146.148 168.956,145.894
  pour cut-out: 181.91,150.974 177.661,150.974 175.941,149.253 175.941,146.275 176.195,146.021 180.767,146.021 181.91,147.164
  region net +3.3V: 154.182,153.194 153.964,152.976 152.186,152.976 151.932,153.23 151.932,157.675 152.44,158.183 154.218,158.183 154.472,157.929 154.472,156.532 154.182,156.242

## Silkscreen, mask and mechanical layers (free items; w line width, h text height)
Top Silkscreen Layer:
  circle w0.254: c105.96,118.076 r4.193
  circle w0.254: c144.944,118.076 r4.193
  text "AC-CP-540P24-ADP32F036-V1.0" at 133.009,165.93 h1.5
  text "20250116" at 133.009,164.025 h1.5
  text "U" at 155.956,114.554 h1.52 r90
  text "V" at 155.956,106.952 h1.52 r90
  text "W" at 155.956,99.476 h1.52 r90
  text "-" at 153.85,80.943 h1.5 r180
  text "+" at 156.33,80.952 h1.5 r180
  text "BUS+" at 92.583,78.994 h1.52 r90
  text "BUS-" at 110.109,78.994 h1.52 r90
  text "24V" at 149.098,77.724 h1
Bottom Silkscreen Layer:
  text "CANL" at 169.331,85.793 h1.14 r270
  text "CANH" at 171.345,85.793 h1.14 r270
  text "24V-" at 173.359,85.793 h1.14 r270
  text "PWMI" at 175.373,85.793 h1.14 r270
  text "STB" at 177.386,85.793 h1.14 r270
  text "24V+" at 179.4,85.793 h1.14 r270